# Altium PCB ffultra_pcb_attempt2.PcbDoc (part 3 of 3)
Units mil, origin at the board's own origin, x right, y up, seen from the top; angles counter-clockwise.
Board outline 1102.36 x 2165.35 mil, 6 copper layers (Top, GND-T, Inner, Power, GND-B, Bottom), stack 60.567 mil thick; 114 components, 86 nets, 459 pads, 324 vias.
Unrouted connection lines stored in the file: 9.
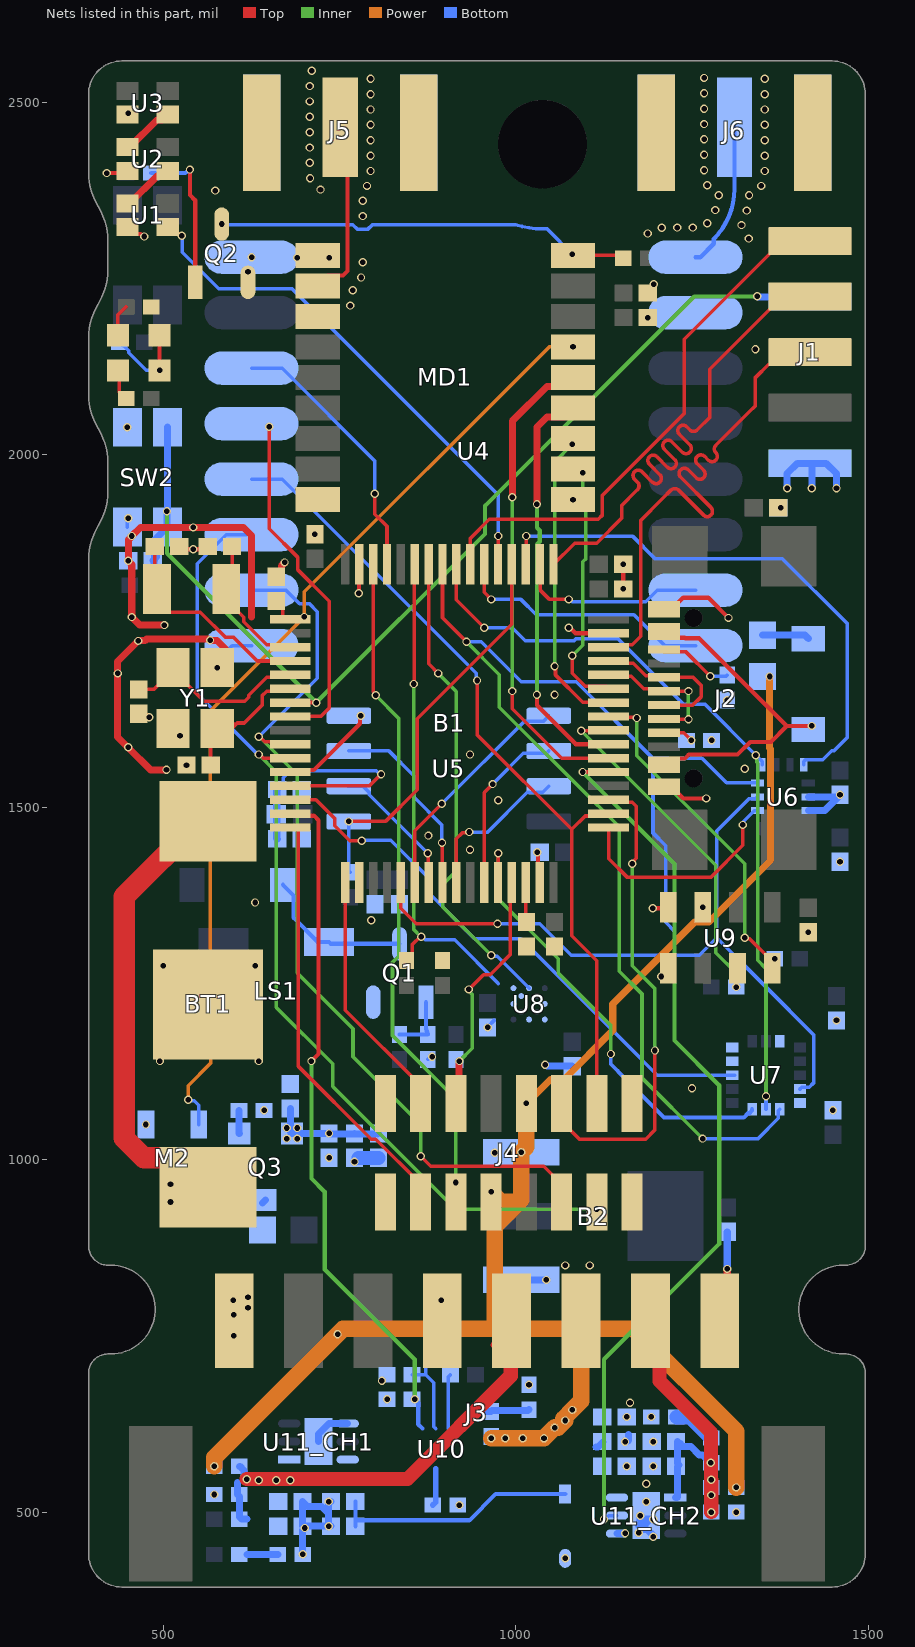
[diagram p6: the nets of this part, all layers, seen from the top]

## Via types
v1: diameter 11.81, hole 7.87, Top to Bottom, tented both sides, 324 vias

## Nets (pads, with @x,y where several pads share a name; then routed paths per layer and width w, separated by ;. In a path a pad name is that pad's centre, name@x,y a point inside that pad or via, vN(x,y) a via of type N, cw(c..) or ccw(c..) an arc to the next point about the centre after c; other vN are vias at no path point) (continued)
EN_CH2: B1.37 U11_CH2.5 | length 1265.8
  Top w6.08: v1(1094.71,1550.2) B1.37@1131.69,1550.2
  Inner w6.08: v1(1094.71,1550.2) 1225,1419.91 1225,1169.08 1288.49,1105.59 1288.49,880.31 1125,716.83 v1(1125,490)
  Bottom w5: v1(1125,490) 1126.72,490 1131.72,495 U11_CH2.5@1143.54,495
"Flash CLK": B1.27 U5.6 | length 244.2
  Top w5: B1.27@955,1393.19 955,1521.03 v1(966.99,1533.01)
  Bottom w5: v1(966.99,1533.01) 1010.67,1576.69 1043.62,1576.69 U5.6@1046.93,1580
"Flash IO 0": B1.22 U5.5 | length 331.4
  Top w5: B1.22@856.57,1393.19 856.57,1466.57 v1(895,1505)
  Bottom w5: v1(895,1505) 1012.44,1622.44 1039.37,1622.44 U5.5@1046.93,1630
"Flash IO 1": B1.23 U5.2 | length 195.5
  Top w5: v1(875,1435) 875.63,1434.37 875.63,1393.82 B1.23@876.26,1393.19
  Bottom w5: U5.2@763.07,1530 783.15,1530 792.04,1521.11 792.04,1517.95 v1(875,1435)
"Flash IO 2": B1.24 U5.3 | length 275.2
  Top w5: v1(895.27,1449.73) 895.61,1449.39 895.61,1393.53 B1.24@895.94,1393.19
  Bottom w5: U5.3@763.07,1580 820,1580 855,1545 855,1515 895,1475 895,1450 v1(895.27,1449.73)
"Flash IO 3": B1.25 U5.7 | length 224.4
  Top w5: B1.25@915.63,1393.19 915.63,1455.41 923.91,1463.7 932.73,1463.7 v1(934.04,1465)
  Bottom w5: v1(934.04,1465) 960,1465 1016.3,1521.3 1038.23,1521.3 U5.7@1046.93,1530
"Flash NCS": B1.52 R15.1 U5.1 | length 564.3
  Top w5: v1(763.07,1480) 815,1480 860,1525 860,1625.47 994.37,1759.84 B1.52@994.37,1845
  Bottom w5: v1(763.07,1480) 763.07,1409.65 R15.1@765,1407.72
GND: B1.12 B1.18 B1.31 B1.47 B1.63 B2.1 BT1.1 C1.1 C2.1 C3.1 C4.1 C5.1 C6.1 C7.1 C8.1 C9.1 C10.1 C11.1 C12.1 C13.1 C14.1 C15.1 C16.1 C17.1 C18.1 C19.1 C20.1 C21.1 C22.1 C23.1 C24.1 C25.2 C27.1 C28.1 C29.2 C30.2 C31.2 C32.1 C33.1 C34_CH1.1 C34_CH2.1 C35_CH1.1 C35_CH2.1 C36_CH1.1 C36_CH2.1 C37_CH1.1 C37_CH2.1 C38.2 D3.C D4.2 D7.C J1.6 J2.A1-B12 J2.B1-A12 J3.1 J3.6 J3.8 J4.1 J4.2 J4.15 J4.16 J5.2 J5.3 J5.4 J5.5 J6.2 J6.3 J6.4 J6.5 M2.1 MD1.1 MD1.10 MD1.12 Q1.2 Q2.2 R2.1 R4.1 R8.1 R9.1 R13.1 R22.1 R23.1 R26.1 R30.1 R36_CH1.1 R36_CH2.1 R38_CH1.1 R38_CH2.1 SW2.2 SW2.2' U1.3 U2.3 U3.3 U4.1 U4.8 U4.10 U5.4 U6.6 U6.7 U7.5 U7.12 U7.13 U7.16 U8.A5 U8.C1 U8.C5 U8.E1 U8.E3 U9.3 U9.4 U9.5 U10.8 U11_CH1.4 U11_CH1.7 U11_CH2.4 U11_CH2.7 Y1.2 Y1.4 | length 2554.7
  Top w6: v1(419.57,2400) 445.63,2400 U2.3@448.9,2403.27 ; U1.3@448.9,2323.27 458.69,2313.47 467.7,2313.47 471.19,2309.98 v1(472.77,2309.98) ; v1(494.53,2120) D7.C@494.53,2170 ; C6.1@522.32,1870 526.18,1866.14 558.82,1866.14 C5.1@562.68,1870 ; B1.12@679.88,1550.2 682.79,1553.1 713.42,1553.1 778.89,1618.57 778.89,1628.89 v1(780,1630) ; v1(777.13,1803.7) 777.48,1804.05 777.48,1844.65 B1.63@777.83,1845 ; v1(1030.43,1436.22) 1031.54,1435.11 1031.54,1395.38 B1.31@1033.74,1393.19 ; v1(1075,1755) 1076.57,1755 1084.53,1747.05 B1.47@1131.69,1747.05 ; v1(1152.32,1810) v1(1152.32,1845) ; v1(1194.12,1356.84) 1214.71,1356.84 U9.4@1216.18,1358.31 ; J2.A1-B12@1210.12,1529.02 1220.94,1529.02 1237.53,1512.43 1269.8,1512.43 v1(1270,1512.64) ; J2.B1-A12@1210.12,1780.98 1220.94,1780.98 1237.53,1797.57 1273.01,1797.57 v1(1301.79,1768.78)
  Top w10: v1(464.15,1736.13) 435,1706.98 435,1600 v1(449.92,1585.08) 481.69,1553.31 v1(504.32,1553.31) ; v1@464.49,1736.47 473.44,1736.47 475.71,1738.74 564.16,1738.74 565.65,1737.25 v1(566.14,1737.25) 566.49,1736.91 576.06,1736.91 Y1.4@588.1,1724.86 ; C7.1@465,1632.68 469.65,1628.02 479.65,1628.02 v1(480,1627.68) ; v1(501.39,1758.66) 466.34,1758.66 v1(455,1770) 455,1844.79 450.28,1849.51 450.28,1879.79 455,1884.51 v1(455,1885) 467.2,1897.2 613.52,1897.2 625,1885.73 625,1770 ; C38.2@660,1827.32 667.2,1834.53 667.2,1842.36 671.87,1847.03 v1(671.87,1847.52) ; J3.8@1288.03,800.51 1300,812.48 v1(1300,845)
  Bottom w5: R2.1@437.28,2160 438.27,2160 450.53,2147.74 450.53,2144.88 475.41,2120 v1(494.53,2120) ; SW2.2@448.82,1897.64 448.82,1908.82 v1(450,1910) ; v1(576.5,1698.31) 577.8,1699.61 577.8,1709.9 597.31,1729.41 U4.1@625.04,1729.41 ; v1(771.1,997.2) C32.1@776.58,1002.68 ; R4.1@875,1142.28 878.86,1146.14 v1(881.14,1146.14) ; v1(960,1187.68) 960,1188.46 C25.2@969.7,1198.17
  Bottom w10: v1(697.72,440) 697.52,440.2 697.52,474.29 v1(700.67,477.44) ; C36_CH1.1@700.28,477.05 C36_CH1.1@697.32,480 C37_CH1.1@697.32,515 704.24,508.09 724.31,508.09 734.33,498.07 ; C36_CH1.1@700.67,480 v1(734.33,480) ; U11_CH1.7@720,600 720,610.91 734.69,625.59 U11_CH1.4@761.46,625.59 ; C35_CH1.1@737.68,480 v1(734.33,480) ; C34_CH1.1@737.68,515 v1(734.33,515) 734.33,498.07 ; B2.1@1007.64,829.45 v1(1043.07,829.45) ; v1(1041.5,1134.85) 1041.99,1134.85 1044.16,1132.68 C24.1@1080,1132.68 ; U11_CH2.4@1143.54,469.41 1143.79,469.65 1154.16,469.65 1154.51,470 v1(1155,470) ; C34_CH2.1@1159.14,600.59 1160.12,601.57 C34_CH2.1@1160.12,610.33 ; U11_CH2.7@1176.46,490 v1(1176.46,495) ; U11_CH2.7@1179.55,478.64 U11_CH2.7@1190.91,490 ; R38_CH2.1@1191.3,635 v1(1192.28,635) ; v1(1195,465) 1195,466.54 1185.98,475.55 1179.88,475.55 1174.09,481.34 1174.09,484.09 1180,490 U11_CH2.7@1190.91,490 ; v1(1195,490) U11_CH2.7@1190.91,490 ; v1(1300,845) C19.1@1300,897.68 ; v1(1385,1952.95) 1385,1973.5 1399.69,1988.19 J1.6@1417.32,1988.19 ; U6.7@1415,1495.32 1438.43,1495.32 1460,1516.89 v1(1460,1517.68) 1457.32,1515 U6.6@1415,1515 ; v1(1420,1952.95) 1420,1985.51 J1.6@1417.32,1988.19 ; v1(1455,1952.95) 1455,1973.5 1440.31,1988.19 J1.6@1417.32,1988.19 ; v1(734.33,480) 734.33,498.07
  Bottom w20: C32.1@776.58,1002.68 C30.2@805,1002.68
  other v1: 1070,434.33 1174.26,470.48 1312.72,500 920,510 1185,514.68 572.28,525 1185,540 1157.32,565 1195.08,565 1155,600 1195,600 1157.32,635 1161.98,655 817.28,660 1018.7,680.74 810,686.18 600,750 600,780 620,790 599.06,800.51 620,805 1070,850 1105,850 735,1002.68 475.2,1050 642.72,1070 1450,1070 1250,1101.59 495,1140 635,1140 1455,1197.68 1206.06,1260 500,1275 630,1275 1415,1322.68 795,1340 1265.39,1358.31 630,1365 1460,1422.68 935,1440 876.03,1460 975,1510 1325,1555 532.68,1560 935,1575 1277.72,1595 523.5,1601.69 1300,1652.28 1055,1660 435,1690 450.28,1850 542.32,1866.14 715,1887.32 542.5,1897.2 1375.67,1925 1081.1,1936.77 448.82,2039.37 1340,2150 1187.32,2195 764.93,2212.07 768.46,2233.59 1195.51,2242.03 780.36,2251.86 620,2260 782.66,2273.55 690,2280 735,2280 625.04,2280.59 1330.7,2307.09 1186.98,2314.24 1207.27,2322.22 1229.08,2322.74 1250.89,2322.74 1320.22,2326.22 1271.84,2328.79 782.66,2338.99 1283.07,2347.49 1327.48,2346.79 782.66,2360.8 1330.97,2368.32 1288.1,2368.72 573.57,2375.24 722.86,2376.65 788.8,2381.72 1348.17,2381.72 1271.43,2382.79 708.02,2392.64 793.85,2402.94 1353.22,2402.94 1267.09,2404.16 707.72,2414.45 793.85,2424.75 1353.22,2424.75 1267.09,2425.97 707.72,2436.26 793.85,2446.57 1353.22,2446.57 1267.09,2447.78 707.72,2458.07 793.85,2468.38 1353.22,2468.38 1267.09,2469.59 707.72,2479.88 450,2485 793.85,2490.19 1353.22,2490.19 1267.09,2491.4 707.72,2501.69 793.85,2512 1353.22,2512 1267.09,2513.22 707.72,2523.5 793.85,2533.81 1353.22,2533.81 1267.09,2535.03 710.66,2545.12
GPS_ANT: J5.1 MD1.11 | length 259.5
  Top w6.08: MD1.11@718.9,2239.92 733.58,2254.6 754.91,2254.6 761.31,2260.99 761.31,2454.48 J5.1@750.79,2465
GPS_NRST: MD1.9 Q2.3 R10.2 | length 593.5
  Top w5: v1(1080,2285) 1080,2284.33 MD1.9@1081.1,2283.23 1148.23,2283.23 R10.2@1152.28,2279.17
  Bottom w5: v1(582.6,2327.72) 583.46,2326.85 768.77,2326.85 775.03,2320.58 790.28,2320.58 796.55,2326.85 1000.1,2326.85 ccw(c1037.97,2440.94) 1037.97,2320.73 1044.27,2320.73 1045.67,2319.33 v1(1080,2285)
GPS_PPS: B1.39 MD1.4 | length 585
  Top w6.08: v1(1030,1660) 1030,1644.78 1085.21,1589.57 B1.39@1131.69,1589.57
  Top w10: v1(1030,1930) 1030,2039.7 1044.27,2053.98 1068.39,2053.98 MD1.4@1081.1,2066.69
  Inner w6.08: v1(1030,1660) 1030,1873.21 1033.94,1877.15 1033.94,1892.85 1030,1896.79 v1(1030,1930)
GPS_PRG: MD1.18
GPS_RX: B1.42 MD1.3 | length 446.6
  Top w5: v1(1055,1700) 1056.3,1698.7 1056.3,1687.84 1095.16,1648.98 1131.33,1648.98 B1.42@1131.69,1648.62 ; MD1.3@1065.89,2008.17 1072.72,2015 v1(1080,2015)
  Inner w5: v1(1055,1700) 1055,1990 v1(1080,2015)
GPS_TX: B1.43 MD1.2 | length 366.3
  Top w5: v1(1080,1715) 1080,1690.07 1098.36,1671.71 1128.29,1671.71 B1.43@1131.69,1668.31 ; v1(1095,1975) 1096.32,1973.68 MD1.2@1096.32,1964.86
  Inner w5: v1(1080,1715) 1095,1730 1095,1848.35 1099.51,1852.86 1099.51,1948.9 1095,1953.41 v1(1095,1975)
GPS_WAKE: B1.38 MD1.5 | length 685.5
  Top w5: v1(995,1665) 995,1640 1065.12,1569.88 B1.38@1131.69,1569.88
  Top w10: v1(995,1940) 995,2048.01 1044.27,2097.28 1068.39,2097.28 MD1.5@1081.1,2110
  Inner w5: v1(995,1665) v1(995,1940)
HRLP_C\S\: B1.28 U7.8 | length 645.4
  Top w5: B1.28@974.68,1393.19 974.84,1393.35 974.84,1434.84 v1(975,1435)
  Inner w5: v1(975,1435) 975,1370 1060,1285 1060,1265 1135,1190 v1(1135,1150)
  Bottom w5: v1(1135,1150) 1135,1135.39 1144.95,1125.45
  Bottom w6: 1144.95,1125.45 1210.39,1060 1323.54,1060 1329.46,1065.91 1331.43,1065.91 1335.32,1069.8 U7.8@1335.32,1071.77
HRLP_INT: B1.14 U7.11 | length 812
  Top w5: B1.14@679.88,1510.83 716.42,1510.83 743.07,1484.17 743.07,1473.97 764.36,1452.68 v1(781.48,1452.68)
  Bottom w5: v1(781.48,1452.68) 782.36,1453.57 822.46,1453.57 875.52,1400.51 875.52,1379.48 941.4,1313.6 1007.32,1313.6 1152.52,1168.41 1200.92,1120 U7.11@1310.95,1120
I2C1_SCL: B1.58 R16.1 U8.A3 | length 681.1
  Top w5: B1.58@876.26,1845 876.26,1703.74 v1(890,1690)
  Inner w5: v1(890,1690) 915.63,1664.37 915.63,1409.6 896.02,1389.99 896.02,1358.98 v1(965,1290)
  Bottom w5: v1(965,1290) 966.3,1288.7 973.59,1288.7 U8.A3@1018.86,1243.43
I2C1_SDA: B1.59 R17.1 U8.B4 | length 714.3
  Top w5: R17.1@845,1282.72 853.33,1291.04 853.33,1305.77 864.15,1316.59 v1(865.81,1316.59) ; v1(855,1675) 855.79,1675.79 855.79,1844.21 B1.59@856.57,1845
  Inner w5: v1(855,1675) 855,1326.59 865,1316.59 v1(865.81,1316.59)
  Bottom w5: v1(865.81,1316.59) 866.62,1316.59 871.33,1311.88 913.12,1311.88 975,1250
I2C2_SCL: B1.29 J4.12 R18.1 | length 355.9
  Top w5: v1(933.18,1241.59) 954.22,1262.64 963.67,1262.64 992.42,1291.39 992.42,1391.24 B1.29@994.37,1393.19
  Top w10: J4.12@915,1080 919.65,1084.65 919.65,1139.65 v1(920,1140)
  Inner w5: v1(920,1140) 938.41,1158.41 938.41,1234.53 933.18,1239.75 v1(933.18,1241.59)
I2C2_SDA: B1.62 J4.11 R19.1 | length 933.3
  Top w5: B1.62@797.52,1845 797.52,1664.32 801.06,1660.78 v1(801.06,1658.94)
  Inner w5: v1(801.06,1658.94) 833.92,1626.08 833.92,1288.92 825,1280 825,1176.25 915,1086.25 v1(915,967.72)
I2C3_SCL: B1.41 R5.1 U9.8 | length 479.5
  Top w3.94: B1.41@1131.69,1628.94 B1.41@1133.84,1626.79
  Top w5: B1.41@1133.84,1626.79 1134.91,1627.86 1170.5,1627.86 v1(1171.57,1626.79) ; v1(1325,1315) 1326.3,1313.7 1331.66,1313.7 1363.82,1281.54 U9.8@1363.82,1271.69
  Inner w5: v1(1171.57,1626.79) 1171.57,1573.43 1325,1420 v1(1325,1315)
  other v1: 1367.28,1285
I2C3_SDA: B1.40 R12.1 U9.7 | length 473.8
  Top w5: v1(1092.86,1608.71) 1093.13,1608.98 1131.42,1608.98 B1.40@1131.69,1609.25
  Inner w5: v1(1092.86,1608.71) 1283.8,1417.77 1283.8,1293.92 1312.72,1265
  other v1: 1312.72,1245
LRHP_INT: B1.51 U6.4 | length 789
  Top w5: B1.51@1014.05,1845 1014.53,1845.47 1014.53,1884.53 v1(1015,1885)
  Bottom w5: v1(1015,1885) 1165.47,1885 1197.57,1852.89 1378.28,1852.89 1470,1761.17 1470,1598.83 1451.52,1580.35 1448.16,1580.35 1435.31,1567.5 1411.03,1567.5 1408.53,1565 U6.4@1408.53,1560.5
LRHP_NSS: B1.33 U6.12 | length 325
  Top w5: B1.33@1131.69,1471.46 1131.69,1427.28 1158.44,1400.53 1276.42,1400.53 1322,1446.11 v1(1322,1475.08)
  Bottom w5: v1(1322,1475.08) 1323.3,1476.38 1323.3,1480.12 1338.5,1495.32 U6.12@1343,1495.32
MCU_EN: B1.15 R22.2 U10.1 | length 983
  Top w6.08: B1.15@679.88,1491.14 682.75,1488.27 713.44,1488.27 720,1481.71 720,1150 v1(710,1140)
  Inner w6.08: v1(710,1140) 710,973.33 728.94,954.38 728.94,844.27 856.65,716.56 v1(856.65,660)
  Bottom w6.08: R22.2@852.72,660 v1(856.65,660) ; R22.2@854.88,661.78 v1(856.65,660) ; U10.1@867.44,618.54 861.49,624.49 861.49,655.16 v1(856.65,660)
MPU_HSE_IN: B1.5 C7.2 Y1.1 | length 270.2
  Top w5: C7.2@465,1667.32 486.46,1667.32 505.47,1686.34 Y1.1@521.54,1686.34 ; Y1.1@513.5,1698.31 513.5,1694.37 Y1.1@521.54,1686.34 ; B1.5@679.88,1687.99 676.48,1684.59 646.55,1684.59 621.17,1659.21 621.17,1656.29 615.26,1650.37 557.5,1650.37 523.5,1684.37 Y1.1@521.54,1686.34
MPU_HSE_OUT: B1.6 C8.2 Y1.3 | length 202.4
  Top w5: C8.2@567.32,1560 567.32,1602.52 Y1.3@576.5,1611.69 586.5,1601.69 597.99,1613.19 Y1.3@599.49,1614.69 ; Y1.3@599.49,1618.63 Y1.3@599.49,1614.69 ; B1.6@679.88,1668.31 676.48,1664.9 653.35,1664.9 646.55,1664.9 640.47,1658.82 640.47,1645.47 614.69,1619.69 604.49,1619.69 Y1.3@599.49,1614.69
MPU_LSE_IN: B1.3 C5.2 Y2.1 | length 201.1
  Top w5: C5.2@597.32,1870 597.32,1818.11 Y2.1@589.21,1810 589.21,1794.25 613.96,1769.51 613.96,1763.36 646.55,1730.77 676.48,1730.77 B1.3@679.88,1727.36
MPU_LSE_OUT: B1.4 C6.2 Y2.2 | length 302
  Top w5: C6.2@487.68,1870 487.68,1797.36 507.97,1777.07 552.36,1777.07 588.38,1741.04 599.61,1741.04 632.98,1707.68 B1.4@679.88,1707.68
MPU_NRST: B1.7 C4.2 J1.9 R1.1 SW2.1 SW2.1' | length 1613.2
  Top w6: B1.7@690.29,1651.53 693.2,1648.62 v1(716.86,1648.62)
  Inner w6: v1(505,1920) 505,1860.48 v1(716.86,1648.62) 956.09,1887.86 956.09,1927.83 1253.26,2225 v1(1342.36,2225)
  Bottom w10: C4.2@484.92,1850 490.24,1855.32 490.24,1881.97 498.03,1889.76 SW2.1@505.91,1897.64 505,1898.54 v1(505,1920) ; SW2.1@487.28,1879.02 487.28,1855.32 487.28,1850 486.32,1849.04 486.32,1816.4 R1.1@487.72,1815 ; SW2.1@505.91,1920 SW2.1'@505.91,2039.37 ; v1(1342.36,2225) 1342.85,2225 1343.44,2224.41 J1.9@1417.32,2224.41
MPU_VCAP1: B1.30 C3.2 | length 56.3
  Top w5: B1.30@1014.05,1393.19 1014.05,1338.27 C3.2@1015,1337.32
NetBT1_2: BT1.2 M2.3 | length 653.8
  Top w29.92: BT1.2@563.3,960.63 521.18,1002.76 472.24,1002.76 444.33,1030.67 444.33,1373.15 551.49,1480.31 BT1.2@563.3,1480.31
  other v1: 510,940 510,965
NetD1_1: D1.1 LS1.2 Q1.3 | length 215
  Bottom w6.08: D1.1@669.5,1390 684.46,1375.04 684.46,1343.49 719.06,1308.9 LS1.2@734.8,1308.9 ; LS1.2@737.34,1306.36 Q1.3@835,1306.36
NetD3_A: D3.A R14.1 | length 45.5
  Top w5: D3.A@435.47,2120 437.28,2118.19 437.28,2089.02 446.3,2080 R14.1@447.28,2080
NetD5_2: D5.2 RT2.1 | length 67.1
  Bottom w10: RT2.1@1350,1744.33 1350.17,1744.5 1410,1744.5 D5.2@1415,1739.5
NetD7_A: D7.A R6.2 | length 45.5
  Top w5: D7.A@435.47,2170 435.47,2199.17 446.3,2210 447.28,2210
NetJ2_A5: J2.A5 R8.2 | length 43.5
  Top w5: J2.A5@1210.12,1605.79 1238.39,1605.79 v1(1249.17,1595)
NetJ2_B5: J2.B5 R9.2 | length 106.3
  Top w5: J2.B5@1211.02,1722.99 1213.52,1720.49 1241.57,1720.49 v1(1276.03,1686.03)
  Top w10: J2.B5@1210.12,1723.9 J2.B5@1211.02,1722.99
  Bottom w5: v1(1276.03,1686.03) 1298.31,1686.03 R9.2@1300,1687.72
NetQ1_1: Q1.1 R3.2 R4.2 | length 86.3
  Bottom w6.08: R3.2@835,1177.72 R4.2@875,1177.72 872.4,1186.49 872.4,1202.95 Q1.1@872.4,1223.64
NetQ2_1: Q2.1 R7.1 | length 208.8
  Top w6: v1(537.64,2405) 537.64,2368.81 545,2361.45 Q2.1@545,2256.24
  Bottom w6: R7.1@482.72,2400 531.07,2400 536.07,2405 v1(537.64,2405)
NetQ3_1: Q3.1 R13.2 | length 32.9
  Bottom w10: R13.2@607.28,1070 607.28,1037.56 Q3.1@607.6,1037.24
NetQ3_3: Q3.3 RT1.2 | length 6.1
  Bottom w10: Q3.3@640.67,938.43 Q3.3@645,942.76
NetR26_2: R26.2 U10.9 | length 53.1
  Bottom w8: R26.2@882.28,510 886.14,513.86 U10.9@886.14,561.46
NetR37_CH1_1: R37_CH1.1 R38_CH1.2 | length 43.7
  Bottom w10: R37_CH1.1@618.54,440 R38_CH1.2@662.28,440
NetR37_CH2_1: R37_CH2.1 R38_CH2.2 | length 60.7
  Bottom w20: R38_CH2.2@1227.72,635 1228.54,634.17 1247.13,634.17 1275.47,605.83 R37_CH2.1@1275.47,605
NetU1_1: U1.1 U2.4 | length 76.4
  Top w10: U1.1@448.9,2356.73 451.85,2356.73 490.59,2395.47 498.19,2395.47 U2.4@505.98,2403.27
NetU2_1: U2.1 U3.4 | length 76.4
  Top w10: U2.1@448.9,2436.73 451.85,2436.73 490.59,2475.47 498.19,2475.47 U3.4@505.98,2483.27
OB_SPI_MISO: B1.56 U6.1 U7.7 | length 1094.7
  Top w5: B1.56@915.63,1845 915.63,1794.37 v1(955,1755)
  Inner w5: v1(1340.47,1574) 1341.78,1572.7 1341.78,1564.25 1343.41,1562.62 1343.41,1282.85 1355,1271.25 v1(1355,1090.08)
  Bottom w5: v1(955,1755) 994.97,1755 1013.37,1736.59 1082.62,1736.59 1085.56,1739.53 1144.44,1739.53 1237.38,1646.59 1267.88,1646.59 v1(1340.47,1574) 1349.47,1565 U6.1@1349.47,1560.5 ; U7.7@1355,1071.77 v1(1355,1090.08)
OB_SPI_MOSI: B1.57 U6.14 U7.6 | length 1854.7
  Top w5: B1.57@895.94,1845 895.94,1769.06 v1(930,1735)
  Inner w5: v1(930,1735) 976.59,1688.41 976.59,1642.29 1087.09,1531.79 1087.22,1531.79 1146.59,1472.42 1146.59,1267.63 1179.04,1235.18 1179.04,1115.96 v1(1265,1030)
  Bottom w5: v1(930,1735) 951.03,1735 1007.62,1678.41 1085.57,1678.41 1194.65,1569.32 ; 1225,1324.5 1212.52,1336.98 1212.52,1445.72 1194.65,1463.6 1194.65,1569.32 ; v1(1265,1030) 1343.65,1030 1372.26,1058.62 1372.26,1069.35 U7.6@1374.68,1071.77 ; U6.14@1343,1534.68 1298.98,1534.68 1264.16,1569.51 1240.72,1569.51 1240.54,1569.32 1194.65,1569.32
OB_SPI_SCK: B1.21 U6.13 U7.4 | length 1038
  Top w5: B1.21@836.89,1393.19 836.89,1356.65 858.54,1335 v1(974.02,1335)
  Bottom w5: v1(974.02,1335) 1033.85,1335 1078.75,1290.1 1260.1,1290.1 1285,1315 ; U6.13@1343,1515 1340.5,1512.5 1331.01,1512.5 1285,1466.49 1285,1315 ; U7.4@1403.23,1100.32 1405.65,1102.74 1416.38,1102.74 1422.46,1108.81 1422.46,1177.54 1355,1245 1285,1315
OFB_SPI_MISO: B1.10 J4.5 U4.2 | length 1300
  Top w5: v1(635,1600) 636.84,1600 643.87,1592.97 676.48,1592.97 B1.10@679.88,1589.57 ; v1(865,1005) 879.04,990.96 1039.67,990.96 1065,965.63 J4.5@1065,940.24
  Inner w5: v1(635,1600) 636.03,1600 690,1546.03 690,1265 768.98,1186.02 768.98,1146.02 865,1050 v1(865,1005)
  Bottom w5: U4.2@625.04,1808.15 673.89,1808.15 693.12,1788.91 707.25,1788.91 718.41,1777.76 718.41,1683.41 v1(635,1600)
OFB_SPI_MOSI: B1.11 J4.3 U4.3 | length 1410.3
  Top w5: v1(635,1575) 636.84,1575 641.96,1569.88 B1.11@679.88,1569.88
  Inner w5: v1(635,1575) 660,1550 660,1216.03 740,1136.03 740,1103.97 913.97,930 v1(1115,930)
  Bottom w5: U4.3@625.04,1886.89 589.1,1886.89 547.74,1845.53 547.74,1661.23 633.97,1575 v1(635,1575)
OFB_SPI_NSS: B1.35 J4.6 | length 692
  Top w5: J4.6@1065,1080 1065,1054.61 1090.33,1029.27 1184.26,1029.27 1197.45,1042.46 v1(1197.45,1155) ; B1.35@1131.69,1510.83 1135.1,1507.42 1165.03,1507.42 1171.1,1501.34 1171.1,1427.95 1165,1421.84 v1(1165,1420)
  Inner w5: v1(1165,1420) 1165,1275 1197.45,1242.55 v1(1197.45,1155)
OFB_SPI_SCK: B1.34 J4.4 U4.4 | length 1175.6
  Top w5: v1(945,1680) 945,1603 1079.31,1468.69 ; J4.4@1115,1080 1115,1282.23 1079.31,1317.92 1079.31,1468.69 ; B1.34@1131.69,1491.14 1128.29,1487.74 1098.36,1487.74 1079.31,1468.69
  Bottom w5: U4.4@625.04,1965.63 668.34,1965.63 943.7,1690.27 943.7,1681.3 v1(945,1680)
OFB_UART_RX: B1.17 J4.14 | length 357.4
  Top w5: B1.17@758.15,1393.19 758.15,1212.24 865,1105.39 J4.14@865,1080
OFB_UART_TX: B1.16 J4.13 | length 616.7
  Top w5: B1.16@679.88,1471.46 688.19,1471.46 691.59,1468.05 691.59,1132.38 794.7,1029.27 801.36,1029.27 865,965.63 J4.13@865,940.24
OUT_CH1: C36_CH1.2 C37_CH1.2 J3.5 R34_CH1.1 R35_CH1.2 R36_CH1.2 U11_CH1.1 | length 661.5
  Top w10: J3.5@969.02,737.4 J3.5@992.76,761.14
  Top w20: v1(618.24,546.76) 846.11,546.76 992.76,693.4 992.76,761.14 J3.5@992.76,800.51
  Bottom w10: 605,542.28 605,525 607.72,522.28 607.72,493.11 610.83,490 R35_CH1.2@618.54,490 ; R34_CH1.1@607.72,565 608.7,565 614.53,559.17 614.53,550.96 618.24,547.25 v1(618.24,546.76)
  other v1: 635,545 660,545 680,545
OUT_CH2: C36_CH2.2 C37_CH2.2 J3.7 R34_CH2.1 R35_CH2.2 R36_CH2.2 U11_CH2.1 | length 442.9
  Top w20: J3.7@1189.61,769.02 1203.75,754.87 1203.75,686.25 1276.79,613.21 v1(1276.79,570) 1276.79,546.32 v1(1277.28,545.83) v1(1277.28,500)
  Bottom w10: U11_CH2.1@1226.46,520.59 1228.97,520.59 1229.72,521.35 C36_CH2.2@1229.72,565 ; C37_CH2.2@1229.72,600 1229.72,597.26 1229.72,568.82 C36_CH2.2@1231.63,566.91 ; C37_CH2.2@1233.54,597.26 1233.54,594.86 1235.32,593.09 1248.35,593.09 1260.14,581.3 1265,581.3 1276.3,570 R35_CH2.2@1277.28,570
  other v1: 1277.28,524.17
P_E\N\: J3.4 R23.2 U10.2 | length 216.4
  Bottom w5: R23.2@852.72,695 872.03,695 ; U10.2@886.14,618.54 883.72,620.96 883.72,683.31 872.03,695 ; v1(894.33,800.51) 872.03,778.21 872.03,695
PG: R24.1 U10.3 | length 77.9
  Bottom w5: U10.3@903.86,618.54 903.86,691.57 R24.1@907.28,695
PG_TH: R25.1 R30.2 U10.4 | length 102.1
  Bottom w10: 925,625 942.72,642.72 R25.1@965,642.72 966.3,644.01 1017.41,644.01 R30.2@1018.7,645.31
Prechannel_Enabled: C33.2 C34_CH1.2 C34_CH2.2 C35_CH1.2 C35_CH2.2 D4.1 U10.6 U11_CH1.6 U11_CH2.6 | length 358.5
  Bottom w6: C35_CH1.2@772.32,480 C34_CH1.2@772.32,515 ; C35_CH1.2@775,488.3 934.03,488.3 971.4,525.67 D4.1@1070,525.67
  Bottom w10: C34_CH2.2@1113.6,592.2 1116.42,592.2 C34_CH2.2@1123.62,599.41
RD_ANT: J6.1 U4.9 | length 207
  Bottom w6.08: U4.9@1254.96,2280.59 1261.85,2280.59 1280.87,2299.61 1280.87,2306.5 ccw(c1210.16,2377.21) 1310.16,2377.21 J6.1@1310.16,2465
RD_BUSY: B1.54 U4.16 | length 371.3
  Top w5: B1.54@955,1845 955,1805 v1(965,1795)
  Bottom w5: v1(965,1795) 1007.33,1795 1028.92,1773.41 1167.66,1773.41 1211.65,1729.41 U4.16@1254.96,1729.41
RD_DIO1: B1.50 U4.15 | length 271.2
  Top w5: B1.50@1033.74,1845 1034.37,1844.37 1034.37,1808.46 1047.83,1795 v1(1075,1795)
  Bottom w5: v1(1075,1795) 1076.84,1795 1080.25,1791.59 1184.2,1791.59 1200.75,1808.15 U4.15@1254.96,1808.15
RD_NSS: B1.8 U4.5 | length 494.7
  Top w5: v1(650,2040) 650,1895.42 690.28,1855.14 690.28,1837.53 735.27,1792.54 735.27,1641 723.21,1628.94 B1.8@679.88,1628.94
RD_RESET: B1.61 U4.6 | length 383.1
  Top w5: v1(800,1945) 800,1915.95 817.2,1898.74 B1.61@817.2,1845
  Bottom w5: U4.6@625.04,2123.11 668.35,2123.11 800,1991.46 v1(800,1945)
SPI3_MOSI: B1.53 U1.4 | length 738.1
  Top w5: U1.4@505.98,2323.27 516.28,2312.97 522.15,2312.97 524.25,2310.87 v1(526.09,2310.87) ; B1.53@974.68,1845 974.84,1845.16 974.84,1884.84 v1(975,1885)
  Bottom w5: v1(526.09,2310.87) 526.81,2310.15 526.81,2287.43 578.4,2235.85 682.43,2235.85 975,1943.27 v1(975,1885)
SWCLK: B1.49 J1.4 | length 778.3
  Top w5: B1.49@1053.43,1845 1083.43,1875 1115,1875 1150,1910 1150,1928.17 1170.92,1949.08 1172.68,1950.85 ccw(c1167.38,1956.16) 1172.68,1961.46 1168.42,1965.73 cw(c1173.72,1971.03) 1168.42,1976.33 cw(c1173.72,1971.03) 1179.02,1976.33 1193.83,1961.52 ccw(c1199.14,1966.83) 1204.44,1961.52 ccw(c1199.14,1966.83) 1204.44,1972.13 1189.63,1986.94 cw(c1194.93,1992.24) 1189.63,1997.55 cw(c1194.93,1992.24) 1200.24,1997.55 1215.05,1982.74 ccw(c1220.35,1988.04) 1225.65,1982.74 ccw(c1220.35,1988.04) 1225.65,1993.34 1210.84,2008.15 cw(c1216.15,2013.46) 1210.84,2018.76 cw(c1216.15,2013.46) 1221.45,2018.76 1236.26,2003.95 ccw(c1241.56,2009.25) 1246.87,2003.95 ccw(c1241.56,2009.25) 1246.87,2014.56 1232.06,2029.37 cw(c1237.36,2034.67) 1232.06,2039.97 cw(c1237.36,2034.67) 1242.66,2039.97 1246.93,2035.71 ccw(c1252.23,2041.01) 1257.54,2035.71 1275,2053.17 1275,2121.81 J1.4@1377.95,2224.76
  Top w6.08: J1.4@1377.95,2224.76 J1.4@1417.32,2224.76
SWDIO: B1.46 J1.3 | length 777.3
  Top w5: B1.46@1131.69,1727.36 1135.1,1730.77 1165.02,1730.77 1177.11,1742.85 1177.11,1907.11 1207.84,1937.84 1220.22,1950.22 cw(c1225.52,1944.92) 1230.83,1950.22 1266.27,1914.77 ccw(c1271.58,1920.08) 1276.88,1914.77 ccw(c1271.58,1920.07) 1276.88,1925.38 1233.93,1968.33 cw(c1239.24,1973.63) 1233.93,1978.93 cw(c1239.24,1973.63) 1244.54,1978.93 1255.85,1967.62 ccw(c1261.15,1972.92) 1266.46,1967.62 ccw(c1261.15,1972.92) 1266.46,1978.23 1257.34,1987.34 cw(c1262.64,1992.65) 1257.34,1997.95 cw(c1262.64,1992.65) 1267.95,1997.95 1273.25,1992.64 ccw(c1278.56,1997.95) 1283.86,1992.64 ccw(c1278.56,1997.95) 1283.86,2003.25 cw(c1289.16,2008.56) 1283.86,2013.86 1330.75,2060.75 1340,2070 1340,2110 1358.84,2128.84 1360.77,2128.84 1377.95,2146.02 J1.3@1417.32,2146.02
SWO: B1.55 J1.5 | length 771.7
  Top w5: B1.55@935.31,1845 935.31,1881.54 962.46,1908.68 1116.9,1908.68 1122.97,1914.76 1122.97,1942.97 1238.83,2058.83 1238.83,2163.21 1238.83,2164.38 1377.95,2303.5 J1.5@1417.32,2303.5
USB_Data_N: B1.44 J2.A7 J2.B7 | length 198
  Top w5: B1.44@1131.69,1687.99 1133.63,1686.06 1163.84,1686.06 1181.66,1668.25 1206.71,1668.25 J2.A7@1210.12,1664.84 1210.2,1664.92 1244.92,1664.92 v1(1245,1665) ; J2.B7@1210.12,1625.47 1210.35,1625.24 1244.76,1625.24 v1(1245,1625)
  Inner w5: v1(1245,1625) v1(1245,1665)
USB_Data_P: B1.45 J2.A6 J2.B6 | length 219.8
  Top w5: B1.45@1131.69,1707.68 1135.1,1704.27 1166.84,1704.27 1184.51,1686.61 1208.04,1686.61 J2.B6@1210.12,1684.53 1251.5,1684.53 1263.41,1672.62 1263.41,1657.38 1251.19,1645.16 J2.A6@1210.12,1645.16
USB_VBUS: D5.1 J2.A4-B9 J2.B4-A9 | length 462.5
  Top w6: J2.A4-B9@1210.12,1560.51 1218.93,1569.32 1239.83,1569.32 1245.51,1575 1314.74,1575 1332.64,1592.91 1361.91,1592.91 1384.5,1615.5 ; J2.B4-A9@1210.12,1749.49 1218.93,1740.68 1239.83,1740.68 1240.52,1739.99 1260.01,1739.99 1384.5,1615.5 ; v1(1420,1615.5) 1384.5,1615.5
VBACKUP: B1.1 C38.1 M2.2 MD1.6 | length 1420.2
  Top w5: C38.1@660,1792.68 669,1783.68 669,1770.14 672.41,1766.73 696.59,1766.73 v1(700,1770.14)
  Power w5: v1(535,1085) 535,1105 566.79,1136.79 566.79,1234.61 566.59,1234.81 566.59,1636.73 v1(700,1770.14) 700,1806.03 1047.28,2153.31 v1(1081.1,2153.31)
  Bottom w5: v1(535,1085) 536.3,1083.7 543.81,1083.7 550,1077.51 M2.2@550,1050
VBAT: B2.3 C20.2 C30.1 C31.1 C32.2 J4.8 J4.9 Q3.2 R25.2 R34_CH1.2 R34_CH2.2 RT2.2 U10.5 | length 2542.7
  Power w10: v1(1015,1080) 1048.95,1113.95 1068.2,1113.95 1137.53,1183.28 1137.53,1221.04 1253.89,1337.4 1274.05,1337.4 1361.38,1424.73 1361.38,1582.66 1360,1584.04 v1(1360,1685.67)
  Power w23.62: v1(572.28,565) 572.28,577.52 754.76,760 963.52,760 ; v1(965,605) v1(1040,605) v1(1055,620) 1060,620 v1(1070,630) ; v1(965,954.61) 979.37,940.24 1005,940.24 ; v1(1015,1080) 1015,1017.91 v1(1007.64,1010.55) 1007.64,942.87 1005,940.24 ; v1@1067.5,632.5 v1(1080,645) 1092.72,657.72 1092.72,760 ; v1(1312.72,535) 1312.72,614.89 1167.6,760 1092.72,760 ; 963.52,760 970,766.48 970,905.24 1005,940.24 ; 963.52,760 1092.72,760
  Bottom w10: C20.2@680,1072.68 680,1039.65 Q3.2@682.4,1037.24 682.48,1037.32 v1(735,1037.32) 736.07,1036.26 770.04,1036.26 C32.2@771.1,1037.32 772.17,1036.26 803.93,1036.26 C30.1@805,1037.32
  other v1: 985,605 1010,605 747.05,752.28 970,1010 990,1010 675,1030 690,1030 675,1045 690,1045
VDDA: B1.13 C1.2 C2.2 FB1.1 | length 371.9
  Top w5: B1.13@679.88,1530.51 792.41,1530.51 v1(808.74,1546.84)
  Bottom w5: C1.2@661.5,1525.31 670.14,1533.95 670.14,1542.09 679.84,1551.79 801.95,1551.79 806.9,1546.84 v1(808.74,1546.84)
  Bottom w10: C2.2@661.5,1455.31 660.74,1456.07 660.74,1489.55 FB1.1@659.98,1490.31 660.74,1491.07 660.74,1524.55 C1.2@661.5,1525.31
pads on no net: J1.1 J1.2 J1.7 J1.8 J2.1 J2.2 J2.3 J2.4 J2.A8 J2.B8 J2.M1 J2.M2 J3.SH1 J3.SH2 LS1.3 MD1.13 MD1.14 MD1.15 MD1.16 MD1.17 U3.1 U4.7 U4.11 U4.12 U4.14 U6.2 U6.3 U6.9 U6.10 U6.11 U7.2 U7.3 U7.9 U7.10 U7.15 U8.D2 U8.D4 U9.6 U10.7 U10.10 U11_CH1.2 U11_CH1.3 U11_CH2.2 U11_CH2.3
copper on no net:
  other v1: 1047.32,1170

## Polygon pours and split planes (outlines as drawn)
GND on Bottom "NONET_L06_P050" (solid, shelved, pour order 50): 1600,340 1600,2640 270,2640 270,350
GND on Bottom "NONET_L06_P039" (solid, shelved, pour order 39): 120,2730 120,315 1615,315 1615,2675
GND on Bottom "NONET_L06_P038" (solid, shelved, pour order 38): 1475,1130 1475,1063.15 1315,1063.15 1315,1130
GND on Bottom "NONET_L06_P017" (solid, shelved, pour order 17): 1155,2545 1155,2175 1482.23,2175 1482.23,2545.22
Prechannel_Enabled on Bottom "NONET_L06_P036" (solid, shelved, pour order 36): 1140.94,588.58 1090,465 751.54,465 743.02,585.24
VBAT on Bottom "NONET_L06_P018" (solid, shelved, pour order 18): 980,1015 980,975 1094.01,975 1094.01,1008.48
3V3 on Bottom "NONET_L06_P049" (solid, shelved, pour order 49): 1185,822.83 1185,1005 1330,1005 1330,822.83
3V3 on Bottom "NONET_L06_P040" (solid, shelved, pour order 40): 1380,1915 1380,1865.87 1475,1865.87 1475,1915
3V3 on Bottom "NONET_L06_P042" (solid, shelved, pour order 42): 1379.09,1754.47 1379.09,1705.33 1474.09,1705.33 1474.09,1754.47
GND on Bottom "NONET_L06_P045" (solid, shelved, pour order 45): 1380,1873.52 1380,1740 1490,1740 1490,1875
VBAT on Bottom "NONET_L06_P037" (solid, shelved, pour order 37): 1103.54,664.51 1103.54,580.78 746.03,580.78 746.03,658.25
GND on Bottom "NONET_L06_P032" (solid, shelved, pour order 32): 940,526.99 940,490 895,490 895,580.93
OUT_CH1 on Bottom "NONET_L06_P031" (solid, shelved, pour order 31): 590,462.44 590,615 696.18,615 696.18,462.56
Prechannel_Enabled on Bottom "NONET_L06_P026" (solid, shelved, pour order 26): 1161.98,509.76 1161.98,655 1105,655 1105,510
OUT_CH2 on Bottom "NONET_L06_P023" (solid, shelved, pour order 23): 1210.83,477.83 1210.83,622.99 1291.97,625.75 1288.03,474.25
GND on Bottom "NONET_L06_P033" (solid, shelved, pour order 33): 764.68,812.4 764.68,771.46 590,771.46 590,812.4
VBAT on Bottom "NONET_L06_P020" (solid, shelved, pour order 20): 764.37,778.7 764.37,741.3 625,741.3 625,778.7
GND on Bottom "NONET_L06_P027" (solid, shelved, pour order 27): 680,422.28 680,635 792.4,635 792.4,595 755,595 755,422.28
GND on Bottom "NONET_L06_P021" (solid, shelved, pour order 21): 1142.4,455.04 1218.86,455.04 1218.86,665 1142.4,665
Prechannel_Enabled on Bottom "NONET_L06_P029" (solid, shelved, pour order 29): 743.02,570.24 792.4,570.24 792.4,415 738.76,415
NetQ3_3 on Bottom "NONET_L06_P001" (solid, shelved, pour order 1): 660,880 660,960 620,960 620,880
GND on Top "NONET_L01_P046" (solid, shelved, pour order 46): 1775,310 1775,2640 270,2640 270,335
GND on Top "NONET_L01_P044" (solid, shelved, pour order 44): 1600,325 1600,2675 185,2675 185,345
3V3 on Top "NONET_L01_P048" (solid, shelved, pour order 48): 1280.83,1866.97 1280.83,1825 1188.54,1825 1188.54,1866.97
BAT+ on Top "NONET_L01_P043" (solid, shelved, pour order 43): 670,871.06 670,928.94 725,928.94 725,771.65 670,771.65
GND on Top "NONET_L01_P000" (solid, shelved, pour order 0): 585,2560 585,2175 927.95,2175 927.95,2559.49
3V3 on Power "NONET_L04_P014" (solid, shelved, pour order 14): 1517.46,2600 355,2600 355,285 1535,285
GND on Power "NONET_L04_P047" (solid, shelved, pour order 47): 1495,2550 1050,2550 1050,2280 1490,2280
GND on Power "NONET_L04_P016" (solid, shelved, pour order 16): 793.85,2558.67 400,2565 393.23,2280 793.85,2280
VBAT on Power "NONET_L04_P013" (solid, shelved, pour order 13): 1069.51,981.04 952.01,981.04 952.01,1026.38 1069.51,1026.38
VBAT on Power "NONET_L04_P012" (solid, shelved, pour order 12): 660.43,1052.28 1015,1052.28 1015,1020 660,1020
GND on Inner "NONET_L03_P041" (solid, shelved, pour order 41): 385,360 385,2595 1575,2595 1575,345
GND on GND-B (split plane): 316 vertices, not listed, extent 413.8,413.8 1475.97,2538.96
GND on GND-T (split plane): 316 vertices, not listed, extent 413.8,413.8 1475.97,2538.96
GND on GND-T (split plane): 586.4,1721.4 586.4,1721.39 611.4,1696.4 613.05,1695.29 615,1694.9 704.9,1694.9 704.9,1658.16 701.84,1655.1 660,1655.1 658.05,1654.71 656.4,1653.6 606.4,1603.6 605.29,1601.95 604.9,1600 604.9,1545.1 482.11,1545.1 430.1,1597.11 430.1,1709.98 464.04,1743.92 563.87,1743.92
GND on GND-T (split plane): 629.9,1889.23 629.9,1762 630.29,1760.05 631.4,1758.4 657.33,1732.46 658.99,1731.35 660.94,1730.97 703.84,1730.97 703.84,1705.1 617.11,1705.1 593.61,1728.6 593.6,1728.6 569.59,1752.62 567.93,1753.73 565.98,1754.11 463.1,1754.11 452.03,1765.18 452.03,1884.82 467.11,1899.9 619.23,1899.9

## Keep-outs
Keep-Out Layer:
  circle w118.11: c1037.97,2440.94 r55.12
  circle w118.11: c1464.57,787.4 r55.12
  circle w118.11: c425.2,785 r55.12

## Other copper
Top:
  pour cut-out: 780.32,2546.8 784.16,2544.24 786.72,2540.4 787.63,2535.87 787.63,2394.13 786.72,2389.6 784.16,2385.76 780.32,2383.2 776.43,2382.42 776.43,2260.99 775.53,2256.46 774.57,2254.14 772,2250.3 765.61,2243.9 762.23,2241.65 762.23,2222.2 761.33,2217.67 758.76,2213.83 754.92,2211.27 750.39,2210.37 687.4,2210.37 682.87,2211.27 679.03,2213.83 676.46,2217.67 675.56,2222.2 675.56,2257.64 676.46,2262.17 679.03,2266.01 682.87,2268.58 687.4,2269.48 732.32,2269.48 733.58,2269.73 746.18,2269.73 746.18,2382.3 725.79,2382.3 721.26,2383.2 717.42,2385.76 714.85,2389.6 713.95,2394.13 713.95,2535.87 714.85,2540.4 717.42,2544.24 721.26,2546.8 725.79,2547.7 775.79,2547.7
Bottom:
  region net MCU_EN: 873.35,635.28 ccw(c871.38,635.28) 871.38,637.24 863.5,637.24 ccw(c863.5,635.28) 861.54,635.28 861.54,623.46 849.72,623.46 ccw(c849.72,621.5) 847.76,621.5 847.76,615.59 ccw(c849.72,615.59) 849.72,613.62 871.38,613.62 ccw(c871.38,615.59) 873.35,615.59
  region net P_E\N\: 891.06,635.28 ccw(c889.09,635.28) 889.09,637.24 883.19,637.24 ccw(c883.19,635.28) 881.22,635.28 881.22,615.59 ccw(c883.19,615.59) 883.19,613.62 889.09,613.62 ccw(c889.09,615.59) 891.06,615.59
  region net GND: 906.81,566.38 900.91,566.38 ccw(c900.91,564.41) 898.94,564.41 898.94,544.72 ccw(c900.91,544.72) 900.91,542.76 906.81,542.76 ccw(c906.81,544.72) 908.78,544.72 908.78,564.41 ccw(c906.81,564.41)
  region net PG: 906.81,637.24 900.91,637.24 ccw(c900.91,635.28) 898.94,635.28 898.94,615.59 ccw(c900.91,615.59) 900.91,613.62 906.81,613.62 ccw(c906.81,615.59) 908.78,615.59 908.78,635.28 ccw(c906.81,635.28)
  region net PG_TH: 928.46,635.28 ccw(c926.5,635.28) 926.5,637.24 918.62,637.24 ccw(c918.62,635.28) 916.65,635.28 916.65,615.59 ccw(c918.62,615.59) 918.62,613.62 940.28,613.62 ccw(c940.28,615.59) 942.24,615.59 942.24,621.5 ccw(c940.28,621.5) 940.28,623.46 928.46,623.46
  region: 940.28,566.38 cw(c940.28,564.41) 942.24,564.41 942.24,558.5 cw(c940.28,558.5) 940.28,556.54 928.46,556.54 928.46,544.72 cw(c926.5,544.72) 926.5,542.76 918.62,542.76 cw(c918.62,544.72) 916.65,544.72 916.65,564.41 cw(c918.62,564.41) 918.62,566.38
  region net NetR26_2: 889.09,566.38 883.19,566.38 ccw(c883.19,564.41) 881.22,564.41 881.22,544.72 ccw(c883.19,544.72) 883.19,542.76 889.09,542.76 ccw(c889.09,544.72) 891.06,544.72 891.06,564.41 ccw(c889.09,564.41)
  region: 871.38,566.38 cw(c871.38,564.41) 873.35,564.41 873.35,544.72 cw(c871.38,544.72) 871.38,542.76 863.5,542.76 cw(c863.5,544.72) 861.54,544.72 861.54,556.54 849.72,556.54 cw(c849.72,558.5) 847.76,558.5 847.76,564.41 cw(c849.72,564.41) 849.72,566.38
  region net VBAT: 940.28,605.75 849.72,605.75 ccw(c849.72,603.78) 847.76,603.78 847.76,595.91 ccw(c849.72,595.91) 849.72,593.94 940.28,593.94 ccw(c940.28,595.91) 942.24,595.91 942.24,603.78 ccw(c940.28,603.78)
  region net Prechannel_Enabled: 940.28,586.06 849.72,586.06 ccw(c849.72,584.09) 847.76,584.09 847.76,576.22 ccw(c849.72,576.22) 849.72,574.25 940.28,574.25 ccw(c940.28,576.22) 942.24,576.22 942.24,584.09 ccw(c940.28,584.09)
GND-T (plane layer: these items are gaps in the copper):
  lines w10: 708.94,1700 708.94,1736.06 660.94,1736.06 635,1762 635,1891.34 621.34,1905 537.44,1905 465,1905 446.93,1886.93 446.93,1763.07 460.98,1749.02 461.93,1749.02 ; 461.93,1749.02 565.98,1749.02 590,1725 615,1700 710,1700 710,1656.05 703.95,1650 660,1650 610,1600 610,1540 507.91,1540 480,1540 425,1595 425,1712.09 461.93,1749.02

## Silkscreen, mask and mechanical layers (free items; w line width, h text height)
Top Overlay:
  drawing of 18 lines, arcs and shapes, not listed
  text "0 1 2" at 582.11,2324.18 h59.06 r90
  text "DBG" at 538.42,2137.86 h59.06
  text "PWR" at 538.42,2057.86 h59.06
  text "Michael Controller" at 720,1435.96 h51.18
  text "FIREFLY ULTRA" at 1194.7,1103.25 h59.06
  text "MICHAEL WAS HERE" at 717.5,501.26 h39.37
Bottom Overlay:
  drawing of 4688 lines, arcs and shapes, not listed
  text "BT0" at 546.58,2417.86 h59.06
  text "RST" at 541.58,2072.86 h59.06
Top Solder:
  circle w118.11: c1464.57,787.4 r55.12
  circle w118.11: c425.2,787.4 r55.12
Bottom Solder:
  circle w118.11: c1464.57,787.4 r55.12
  circle w118.11: c1464.57,787.4 r55.12
  circle w118.11: c425.2,787.4 r55.12
Board Outline:
  lines w5.91: 1385.83,2118.11 ccw(c1385.83,2106.3) 1385.83,2094.49 1496.06,2094.49 1496.06,877.95 cw(c1468.5,877.95) 1468.5,850.39 1464.57,850.39 ccw(c1464.57,787.4) 1464.57,724.41 1468.5,724.41 cw(c1468.5,696.85) 1496.06,696.85 1496.06,440.94 cw(c1448.82,440.94) 1448.82,393.7 440.94,393.7 cw(c440.94,440.94) 393.7,440.94 393.7,696.85 cw(c421.26,696.85) 421.26,724.41 425.2,724.41 ccw(c425.2,787.4) 425.2,850.39 421.26,850.39 cw(c421.26,877.95) 393.7,877.95 393.7,1850.39 cw(c488.47,1850.39) 407.48,1899.61 ccw(c326.49,1948.82) 421.26,1948.82 421.26,1988.19 ccw(c326.49,1988.19) 407.48,2037.4 cw(c488.47,2086.61) 393.7,2086.61 393.7,2165.35 cw(c488.47,2165.35) 407.48,2214.57 ccw(c326.49,2263.78) 421.26,2263.78 421.26,2303.15 ccw(c326.49,2303.15) 407.48,2352.36 cw(c488.47,2401.57) 393.7,2401.57 393.7,2511.81 cw(c440.94,2511.81) 440.94,2559.06 1448.82,2559.06 cw(c1448.82,2511.81) 1496.06,2511.81 1496.06,2118.11 1385.83,2118.21

## Text inside footprints (layer, text, board x,y; h text height)
J5: Top Assembly "PCB EDGE" at 826.85,2588.27 h19.68 r180
J6: Bottom Assembly "PCB EDGE" at 1234.1,2588.27 h19.68 r180
U6: Bottom 3D Body "*" at 1364.63,1563.5 h50 r90; Bottom Overlay "*" at 1325,1625.32 h50 r90